# Altium PCB main.PcbDoc (part 1 of 3)
Units mm, origin at the board's own origin, x right, y up, seen from the top; angles counter-clockwise.
Board outline 200 x 85 mm, 2 copper layers (Top Layer, Bottom Layer); 362 components, 202 nets, 1059 pads, 878 vias.
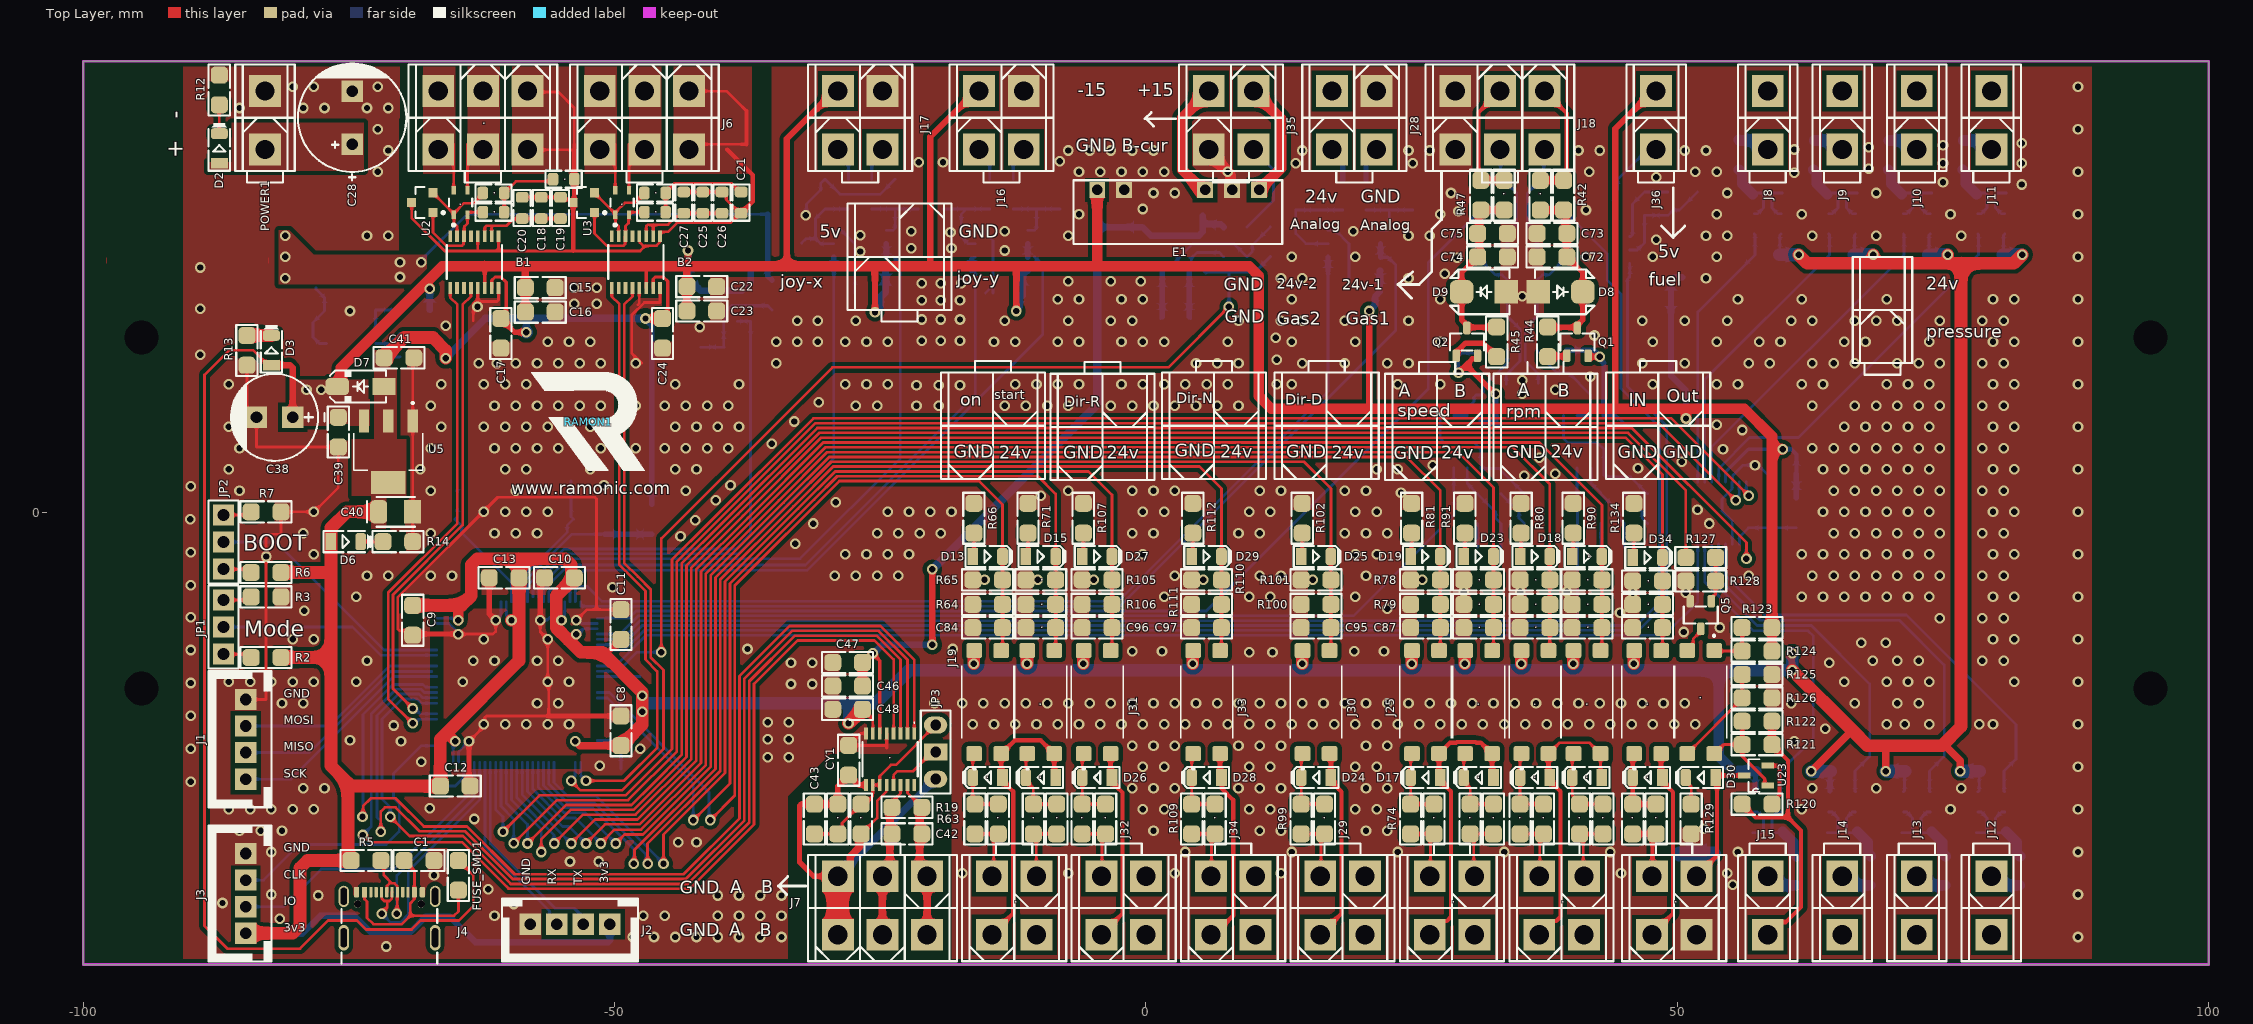
[diagram p0: Top Layer view]
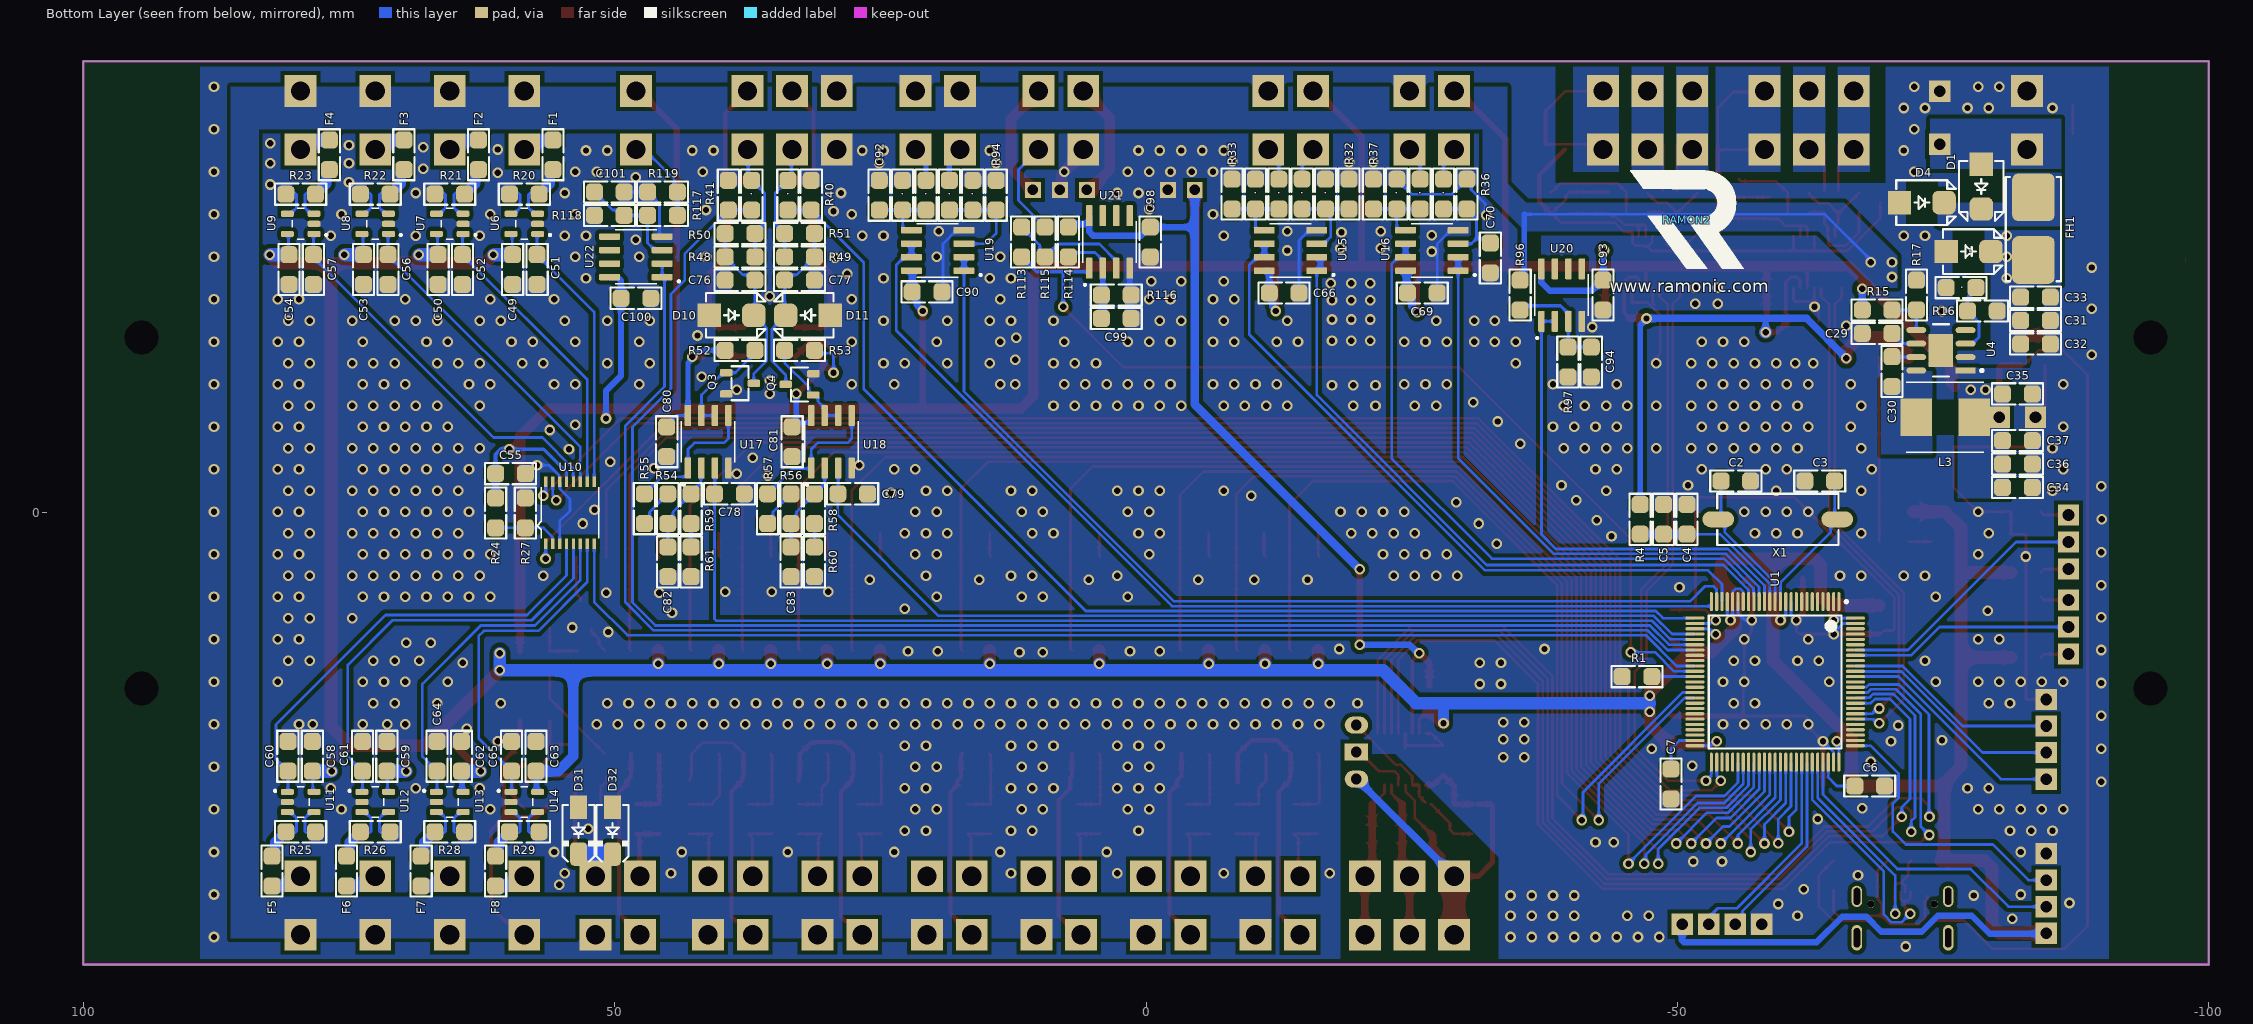
[diagram p1: Bottom Layer view, seen from below]
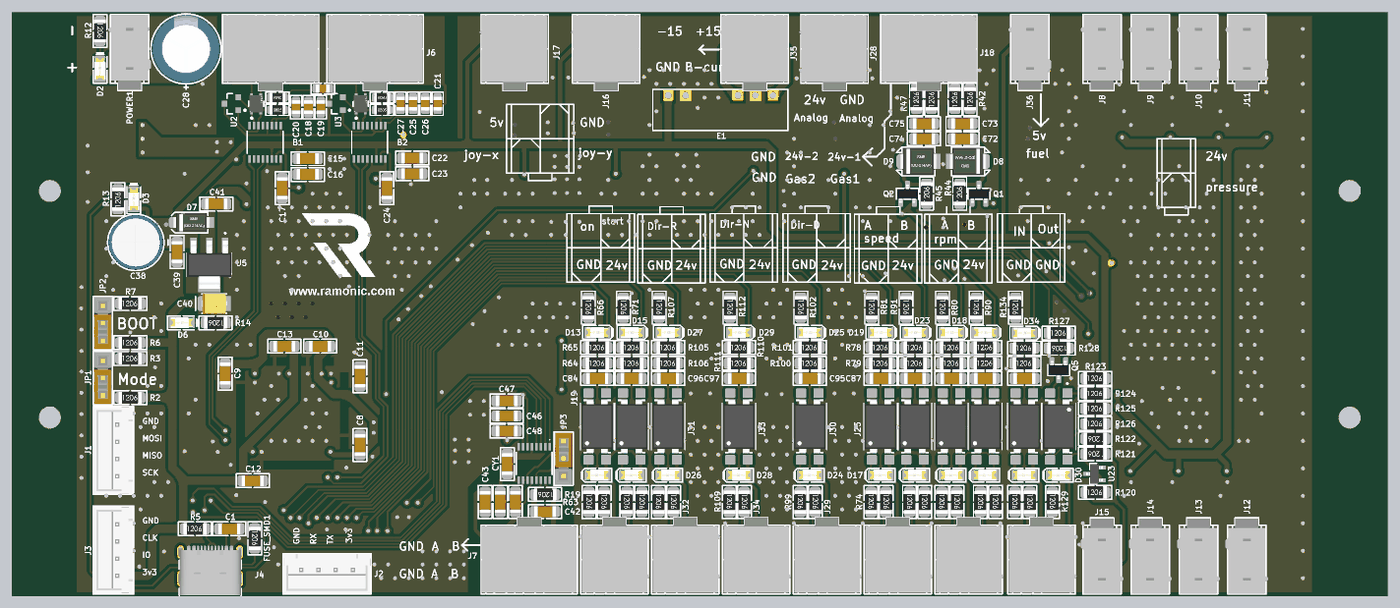
[diagram p4: 3D render of the assembled board from above, using the file's embedded part models]
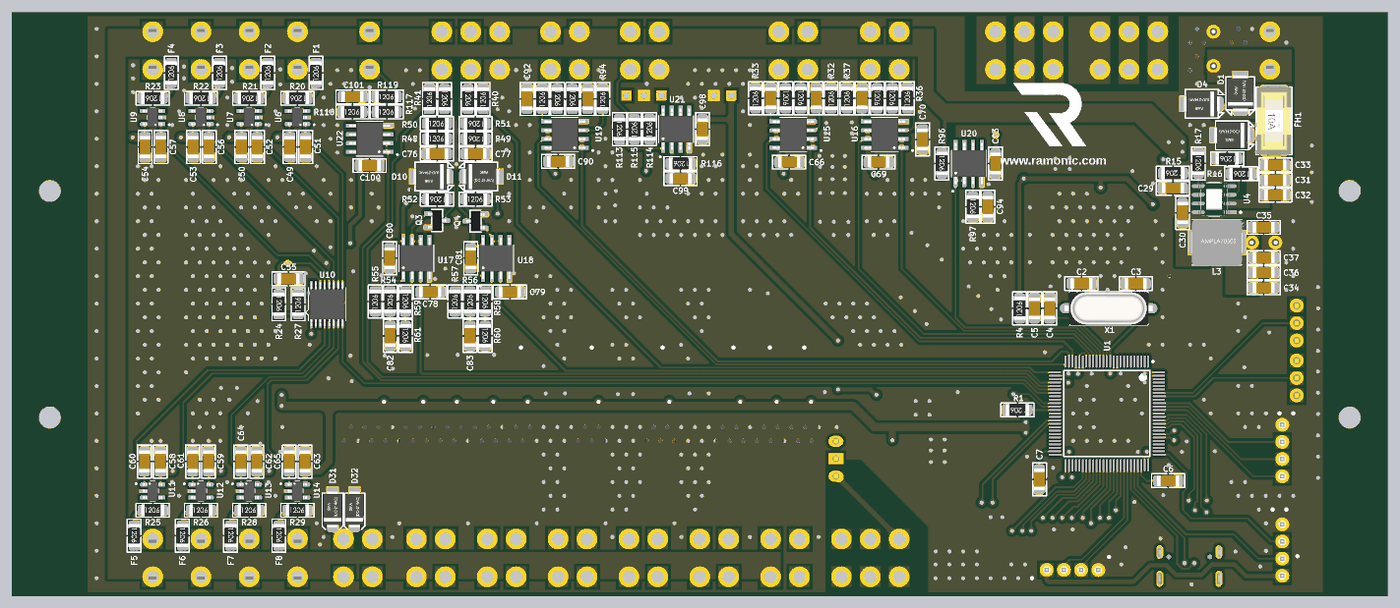
[diagram p5: 3D render of the assembled board from below, using the file's embedded part models]

## Layer stack, top to bottom
Top Solder: solder mask 0.0102, Solder Resist, Dk 3.5
Top Layer: signal copper 0.0356
Dielectric 1: dielectric 0.32, FR-4, Dk 4.8
Bottom Layer: signal copper 0.0356
Bottom Solder: solder mask 0.0102, Solder Resist, Dk 3.5

## Board outline
-100,-42.5 100,-42.5 100,42.5 -100,42.5

## Design rules (kind name [scope] priority, off if disabled: settings)
AcuteAngle [All] p1: minimum=7.50000000000000E+0001 checktracksonly=FALSE
BoardOutlineClearance [All] p1: gap=0.4 ignorepadtopadclearanceinfootprint=FALSE
Clearance [All] p1: gap=0.2 ignorepadtopadclearanceinfootprint=FALSE except(0.3: Arc-THPad Arc-Hole Track-THPad Track-Hole SMDPad-THPad SMDPad-Hole THPad-THPad THPad-Via THPad-Fill THPad-Region THPad-Hole Via-Via Via-Fill Via-Region Via-Hole Fill-Hole Region-Hole; 0.4: Arc-Poly Track-Poly SMDPad-Poly THPad-Poly Via-Poly Fill-Poly Poly-Poly Poly-Region Poly-Text Poly-Hole)
FanoutControl Fanout_Default [All] p1: bgadir=Out bgaviamode=Centered fanoutstyle=Auto fanoutdirection=Alternating viagrid=0.025 // Fanout_Default (Default Rule)
FanoutControl Fanout_Small [(CompPinCount < 5)] p2: bgadir=Out bgaviamode=Centered fanoutstyle=Auto fanoutdirection=OutThenIn viagrid=0.025 // Fanout_Small (Default Rule)
FanoutControl Fanout_LCC [IsLCC] p4: bgadir=Out bgaviamode=Centered fanoutstyle=Auto fanoutdirection=Alternating viagrid=0.025 // Fanout_LCC (Default Rule)
FanoutControl Fanout_BGA [IsBGA] p5: bgadir=Out bgaviamode=Centered fanoutstyle=Auto fanoutdirection=Alternating viagrid=0.025 // Fanout_BGA (Default Rule)
HoleSize [All] p1: absolutevalues=TRUE maxlimit=50 minlimit=0.4 maxpercent=80.000 minpercent=20.000
HoleToHoleClearance [All] p1: gap=0.3 allowstackedmicrovias=TRUE
MinimumAnnularRing [All] p1: minimumring=0.2
MinimumSolderMaskSliver [All] p1: minsoldermaskwidth=0.2
PlaneConnect [All] p1: planeconnectstyle=Direct reliefexpansion=0.508 reliefentries=4 reliefconductorwidth=0.254 reliefairgap=0.254
PolygonConnect [All] p1: connectstyle=Direct reliefconductorwidth=0.254 reliefentries=4 polygonreliefangle="90 Angle" airgapwidth=0.254
RoutingVias [All] p1: holewidth=0.5 width=0.9 viastyle="Through Hole" minholewidth=0.4 minwidth=0.8 maxholewidth=2 maxwidth=3
SilkToSolderMaskClearance [IsPad] p1: minsilkscreentomaskgap=0.2 clearancetoexposedcopper=TRUE
SolderMaskExpansion [All] p1: expansion=0.102 istentingtop=FALSE
SupplyNets "Schematic Supply Nets_9" [InNet('GND6')] p1: voltage=0.000
SupplyNets "Schematic Supply Nets_8" [InNet('GND2')] p2: voltage=0.000
SupplyNets "Schematic Supply Nets_7" [InNet('GND3')] p3: voltage=0.000
SupplyNets "Schematic Supply Nets_6" [InNet('GND5')] p4: voltage=0.000
SupplyNets "Schematic Supply Nets_5" [InNet('GND4')] p5: voltage=0.000
SupplyNets "Schematic Supply Nets_4" [InNet('GND7')] p6: voltage=0.000
SupplyNets "Schematic Supply Nets_3" [InNet('GND1')] p7: voltage=0.000
SupplyNets "Schematic Supply Nets_2" [InNet('MGND')] p8: voltage=0.000
SupplyNets "Schematic Supply Nets_1" [InNet('MCUGND')] p9: voltage=0.000
SupplyNets "Schematic Supply Nets" [InNet('RGND')] p10: voltage=0.000
Width [All] p1: maxlimit=10 minlimit=0.2 preferedwidth=0.254
21 further rules are at their usual default settings.

## Classes and differential pairs
component class INPUTOUTPUTDIGITAL: . D30 D31 D32 D34 Q5 R120 R121 R122 R123 R124 R125 R126 R127 R128 R129 R134 U23
component class switchStart: . C84 D13 D15 J19 R63 R64 R65 R66 R71
component class speed-and-rpm: . C87 D17 D18 D19 D23 J25 R74 R78 R79 R80 R81 R90 R91
component class speed-and-rpm-analog: . C90 C92 J28 R94 U19
component class RS485: . C42 C43 C46 C47 C48 CY1 J7 JP3 R19
component class pressure-transmitter: C49 C50 C51 C52 C53 C54 C55 C56 C57 C58 C59 C60 C61 C62 C63 C64 C65 F1 F2 F3 F4 F5 F6 F7 F8 J8 J9 J10 J11 J12 J13 J14 J15 R20 R21 R22 R23 R24 R25 R26 R27 R28 R29 U6 U7 U8 U9 U10 U11 U12 U13 U14
component class power: . C28 C29 C30 C31 C32 C33 C34 C35 C36 C37 C38 C39 C40 C41 D1 D2 D3 D4 D6 D7 FH1 L3 POWER1 R12 R13 R14 R15 R16 R17 U4 U5
component class Micro-Switch: . C95 C96 C97 D24 D25 D26 D27 D28 D29 J29 J30 J31 J32 J33 J34 R99 R100 R101 R102 R105 R106 R107 R109 R110 R111 R112
component class MainCurrent: C98 C99 E1 J35 R113 R114 R115 R116 U21
component class gas: . C72 C73 C74 C75 C76 C77 C78 C79 C80 C81 C82 C83 D8 D9 D10 D11 J18 Q1 Q2 Q3 Q4 R40 R41 R42 R44 R45 R47 R48 R49 R50 R51 R52 R53 R54 R55 R56 R57 R58 R59 R60 R61 U17 U18
component class fuelGauge: C100 C101 J36 R117 R118 R119 U22
component class CAN: . B1 B2 C15 C16 C17 C18 C19 C20 C21 C22 C23 C24 C25 C26 C27 J6 U2 U3
component class battery-voltage: C93 C94 R96 R97 U20
component class analog-joystick: . C66 C69 C70 J16 J17 R32 R33 R36 R37 U15 U16
component class MCU: C1 C2 C3 C4 C5 C6 C7 C8 C9 C10 C11 C12 C13 FUSE_SMD1 J1 J2 J3 J4 JP1 JP2 R1 R2 R3 R4 R5 R6 R7 RAMON1 RAMON2 U1 X1

## Components (designator, comment, footprint, x,y, rotation, side; value= is the part's Value field where it differs from the comment)
. "LED1206RED" LED1206RED 47.2,-24.9 r180 top (schematic designator D33)
. "LED1206GRN" LED1206GRN 41.5,-4.1 r0 top (schematic designator D22)
. "LED1206RED" LED1206RED 31.3,-24.9 r180 top locked (schematic designator D21)
. "LED1206RED" LED1206RED 41.5,-24.9 r180 top locked (schematic designator D20)
. "LED1206RED" LED1206RED 36.6,-24.9 r180 top locked (schematic designator D16)
. "LED1206RED" LED1206RED -9.9,-24.9 r180 top locked (schematic designator D14)
. "LED1206RED" LED1206RED -14.9,-24.9 r180 top locked (schematic designator D12)
. "RES1206 4.7K 1%" R1206#1 47.2,-6.4 r0 top (schematic designator R133)
. "RES1206 4.7K 1%" R1206#1 47.2,-8.6 r0 top (schematic designator R132)
. "RES1206 4.7K 1%" R1206#1 48,-28.8 r270 top (schematic designator R131)
. "RES1206 4.7K 1%" R1206#1 45.8,-28.8 r270 top (schematic designator R130)
. "EL817S" SOIC254P1030X460-4N 47.2,-17.8 r90 top (schematic designator J39)
. "CONN_ATXPWR_4" ATXPWR_4 49.7,-37.191 r180 top locked (schematic designator J38)
. "EL817S" SOIC254P1030X460-4N 52.2,-17.8 r270 top (schematic designator J37)
. "CAP1206 100nf 50V" C1206#1 47.2,-10.8 r180 top locked (schematic designator C102)
. "CAP0805 4.7nf 50V" C0805 -54.8,31.4 r0 top (schematic designator C14)
. "CAP1206 10uf 50V" C1206#1 -29,-28.8 r90 top (schematic designator C44)
. "CAP1206 1uf 50V" C1206#1 -26.8,-28.8 r270 top (schematic designator C45)
. "CAP1206 100nf 50V" C1206#2 -16.9,30 r90 bottom locked (schematic designator C67)
. "CAP1206 100nf 50V" C1206#2 -10.3,30 r90 bottom locked (schematic designator C68)
. "CAP1206 100nf 50V" C1206#2 -23.6,30 r90 bottom locked (schematic designator C71)
. "CAP1206 1nf 50V" C1206#1 -9.9,-10.8 r180 top locked (schematic designator C85)
. "CAP1206 1nf 50V" C1206#1 36.6,-10.8 r180 top locked (schematic designator C86)
. "CAP1206 1nf 50V" C1206#1 41.5,-10.8 r180 top locked (schematic designator C88)
. "CAP1206 1nf 50V" C1206#1 31.3,-10.8 r180 top locked (schematic designator C89)
. "CAP1206 1nf 50V" C1206#2 16.3,29.9 r90 bottom (schematic designator C91)
. "CONN_ATXPWR_4" ATXPWR_4 -12.4,-37.191 r180 top locked (schematic designator J20)
. "EL817S" SOIC254P1030X460-4N -9.9,-17.8 r90 top locked (schematic designator J21)
. "CONN_ATXPWR_4" ATXPWR_4 39.1,-37.191 r180 top locked (schematic designator J22)
. "CONN_ATXPWR_4" ATXPWR_4 28.8,-37.191 r180 top locked (schematic designator J23)
. "EL817S" SOIC254P1030X460-4N 36.6,-17.8 r90 top locked (schematic designator J24)
. "EL817S" SOIC254P1030X460-4N 41.5,-17.8 r90 top locked (schematic designator J26)
. "EL817S" SOIC254P1030X460-4N 31.3,-17.8 r90 top locked (schematic designator J27)
. "ACM2520-102-2P-T002" FP-ACM2520-2P-MFG -64.5,29.2 r90 top (schematic designator L1)
. "ACM2520-102-2P-T002" FP-ACM2520-2P-MFG -49.3,29.2 r90 top (schematic designator L2)
. "RES1206 60 1%" R0805 -46.2,28.3 r0 top (schematic designator R11)
. "RES1206 10K 1%" R1206#2 -76.7,21.2 r0 bottom (schematic designator R18)
. "RES1206 1k 1%" R1206#2 -14.7,30 r270 bottom locked (schematic designator R30)
. "RES1206 1k 1%" R1206#2 -12.5,30 r270 bottom locked (schematic designator R31)
. "RES1206 1k 1%" R1206#2 -28,30 r270 bottom locked (schematic designator R34)
. "RES1206 1k 1%" R1206#2 -25.8,30 r270 bottom locked (schematic designator R35)
. "RES1206 100k 1%" R1206#2 33.7,29.9 r270 bottom (schematic designator R38)
. "RES1206 100k 1%" R1206#2 37.1,29.9 r270 bottom (schematic designator R39)
. "RES1206 1.6k 1%" R1206#1 33.7,29.9 r90 top (schematic designator R43)
. "RES1206 1.6k 1%" R1206#1 37.1,29.9 r90 top (schematic designator R46)
. "RES1206 4.7K 1%" R1206#1 -13.9,-28.8 r270 top (schematic designator R62)
. "RES1206 4.7K 1%" R1206#1 -10.6,-28.8 r270 top (schematic designator R67)
. "RES1206 4.7K 1%" R1206#1 -8.4,-28.8 r270 top (schematic designator R68)
. "RES1206 4.7K 1%" R1206#1 -9.9,-6.3 r0 top locked (schematic designator R69)
. "RES1206 4.7K 1%" R1206#1 -9.9,-8.6 r0 top locked (schematic designator R70)
. "RES1206 4.7K 1%" R1206#1 37.4,-28.8 r270 top locked (schematic designator R72)
. "RES1206 4.7K 1%" R1206#1 35.2,-28.8 r270 top locked (schematic designator R73)
. "RES1206 4.7K 1%" R1206#1 27.1,-28.8 r270 top locked (schematic designator R75)
. "RES1206 4.7K 1%" R1206#1 36.6,-8.6 r0 top locked (schematic designator R76)
. "RES1206 4.7K 1%" R1206#1 36.6,-6.3 r0 top locked (schematic designator R77)
. "RES1206 4.7K 1%" R1206#1 40.8,-28.8 r270 top locked (schematic designator R82)
. "RES1206 4.7K 1%" R1206#1 43,-28.8 r270 top locked (schematic designator R83)
. "RES1206 4.7K 1%" R1206#1 30.5,-28.8 r270 top locked (schematic designator R84)
. "RES1206 4.7K 1%" R1206#1 32.7,-28.8 r270 top locked (schematic designator R85)
. "RES1206 4.7K 1%" R1206#1 41.5,-8.6 r0 top locked (schematic designator R86)
. "RES1206 4.7K 1%" R1206#1 41.5,-6.3 r0 top locked (schematic designator R87)
. "RES1206 4.7K 1%" R1206#1 31.3,-8.6 r0 top locked (schematic designator R88)
. "RES1206 4.7K 1%" R1206#1 31.3,-6.3 r0 top locked (schematic designator R89)
. "RES1206 10k 1%" R1206#2 18.5,29.9 r270 bottom (schematic designator R92)
. "RES1206 10k 1%" R1206#2 20.7,29.9 r270 bottom (schematic designator R93)
. "RES1206 1k 1%" R1206#2 22.9,29.9 r90 bottom (schematic designator R95)
. "RES1206 4.7K 1%" R1206#1 16.8,-28.8 r270 top locked (schematic designator R98)
. "RES1206 4.7K 1%" R1206#1 -3.8,-28.8 r270 top locked (schematic designator R103)
. "RES1206 4.7K 1%" R1206#1 -6,-28.8 r270 top locked (schematic designator R104)
. "RES1206 4.7K 1%" R1206#1 6.5,-28.8 r270 top locked (schematic designator R108)
. "CA-IS2092A" CAIS2062A -24.075,-23.175 r270 top (schematic designator RS1)
. "CONN_ATXPWR_6" ATXPWR_6 -62.4,37.191 r0 top (schematic designator J5)
. "RES1206 60 1%" R0805 -46.2,30.1 r180 top (schematic designator R10)
. "SMBJ24CA" D_SMB#1 -77.4,24.6 r180 bottom (schematic designator D5)
. "RES1206 60 1%" R0805 -61.4,28.3 r0 top (schematic designator R9)
. "RES1206 60 1%" R0805 -61.4,30.1 r180 top (schematic designator R8)
B1 "CA-IS2062A" CAIS2062A -63.2,23.6 r90 top locked
B2 "CA-IS2062A" CAIS2062A -48,23.6 r90 top locked
C1 "CAP1206 100nf 50V" C1206#1 -68.4,-32.7 r180 top
C2 "CAP1206 22pf 50V" C1206#2 -55.5,3 r0 bottom locked
C3 "CAP1206 22pf 50V" C1206#2 -63.4,3 r180 bottom locked
C4 "CAP1206 1uf 50V" C1206#2 -50.9,-0.6 r270 bottom locked
C5 "CAP1206 100nf 50V" C1206#2 -48.7,-0.6 r270 bottom locked
C6 "CAP1206 2.2uf 50V" C1206#2 -68.1,-25.7 r0 bottom
C7 "CAP1206 2.2uf 50V" C1206#2 -49.4,-25.5 r90 bottom
C8 "CAP1206 100nf 50V" C1206#1 -49.4,-20.5 r270 top locked
C9 "CAP1206 100nf 50V" C1206#1 -69,-10.1 r90 top locked
C10 "CAP1206 100nf 50V" C1206#1 -55.2,-6.1 r0 top locked
C11 "CAP1206 100nf 50V" C1206#1 -49.4,-10.5 r270 top locked
C12 "CAP1206 100nf 50V" C1206#1 -65,-25.7 r180 top locked
C13 "CAP1206 100nf 50V" C1206#1 -60.4,-6.1 r0 top locked
C15 "CAP1206 10uf 50V" C1206#1 -57,21.2 r180 top
C16 "CAP1206 100nf 50V" C1206#1 -57,18.9 r180 top
C17 "CAP1206 100nf 50V" C1206#1 -60.7,16.9 r270 top
C18 "CAP0805 100nf 50V" C0805 -56.9,28.7 r270 top
C19 "CAP0805 100nf 50V" C0805 -55.1,28.7 r270 top
C20 "CAP0805 100nf 50V" C0805 -58.7,28.7 r270 top
C21 "CAP0805 4.7nf 50V" C0805 -38.1,29.2 r270 top
C22 "CAP1206 10uf 50V" C1206#1 -41.8,21.3 r180 top
C23 "CAP1206 100nf 50V" C1206#1 -41.8,19 r180 top
C24 "CAP1206 100nf 50V" C1206#1 -45.5,16.9 r270 top
C25 "CAP0805 100nf 50V" C0805 -41.7,29.2 r270 top
C26 "CAP0805 100nf 50V" C0805 -39.9,29.2 r270 top
C27 "CAP0805 100nf 50V" C0805 -43.5,29.2 r270 top
C28 "HT1V477M1012PC" C_EL_10X16 -74.7,37.191 r90 top locked value=470uF
C29 "CAP1206 1uf 50V" C1206#2 -68.8,16.9 r0 bottom
C30 "CAP1206 100nf 50V" C1206#2 -70.2,13.3 r270 bottom
C31 "CAP1206 10uf 50V" C1206#2 -83.7,18.1 r180 bottom
C32 "CAP1206 10uf 50V" C1206#2 -83.7,15.9 r180 bottom
C33 "CAP1206 220nf 50V" C1206#2 -83.7,20.3 r180 bottom
C34 "CAP1206 10uf 50V" C1206#2 -82,2.4 r180 bottom
C35 "CAP1206 10uf 50V" C1206#2 -82,11.2 r180 bottom
C36 "CAP1206 10uf 50V" C1206#2 -82,4.6 r180 bottom
C37 "CAP1206 10uf 50V" C1206#2 -82,6.8 r180 bottom
C38 "100uF" C_EL_8X12 -82,9 r180 top
C39 "CAP1206 1uf 50V" C1206#1 -76,7.6 r270 top
C40 "47uF" C_TN_3528 -70.6,0.1 r0 top
C41 "CAP1206 2.2uf 50V" C1206#1 -70.3,14.6 r0 top
C42 "CAP1206 100nf 50V" C1206#1 -22.5,-30.2 r180 top
C43 "CAP1206 10nf 50V" C1206#1 -31.2,-28.8 r90 top
C46 "CAP1206 10uf 50V" C1206#1 -28.075,-16.275 r180 top
C47 "CAP1206 10nf 50V" C1206#1 -28.075,-14.075 r180 top
C48 "CAP1206 1uf 50V" C1206#1 -28.075,-18.475 r180 top
C49 "CAP1206 100nf 50V" C1206#2 59.6,22.9 r90 bottom locked
C50 "CAP1206 100nf 50V" C1206#2 66.614,22.9 r90 bottom locked
C51 "CAP1206 100nf 50V" C1206#2 57.3,22.9 r270 bottom locked
C52 "CAP1206 100nf 50V" C1206#2 64.314,22.9 r270 bottom locked
C53 "CAP1206 100nf 50V" C1206#2 73.629,22.9 r90 bottom locked
C54 "CAP1206 100nf 50V" C1206#2 80.643,22.9 r90 bottom locked
C55 "CAP1206 100nf 50V" C1206#2 59.8,3.7 r0 bottom
C56 "CAP1206 100nf 50V" C1206#2 71.329,22.9 r270 bottom locked
C57 "CAP1206 100nf 50V" C1206#2 78.343,22.9 r270 bottom locked
C58 "CAP1206 100nf 50V" C1206#2 78.443,-22.9 r270 bottom locked
C59 "CAP1206 100nf 50V" C1206#2 71.429,-22.9 r270 bottom locked
C60 "CAP1206 100nf 50V" C1206#2 80.743,-22.9 r90 bottom locked
C61 "CAP1206 100nf 50V" C1206#2 73.729,-22.9 r90 bottom locked
C62 "CAP1206 100nf 50V" C1206#2 64.414,-22.9 r270 bottom locked
C63 "CAP1206 100nf 50V" C1206#2 57.4,-22.9 r270 bottom locked
C64 "CAP1206 100nf 50V" C1206#2 66.714,-22.9 r90 bottom locked
C65 "CAP1206 100nf 50V" C1206#2 59.7,-22.9 r90 bottom locked
C66 "CAP1206 100nf 50V" C1206#2 -13,20.7 r0 bottom
C69 "CAP1206 100nf 50V" C1206#2 -26,20.7 r0 bottom
C70 "CAP1206 100nf 50V" C1206#2 -32.4,24 r270 bottom
C72 "CAP1206 100nf 50V" C1206#1 38.2,24.1 r180 top
C73 "CAP1206 1uf 50V" C1206#1 38.2,26.3 r180 top
C74 "CAP1206 100nf 50V" C1206#1 32.6,24.1 r0 top
C75 "CAP1206 1uf 50V" C1206#1 32.6,26.3 r0 top
C76 "CAP1206 330pf 50V" C1206#2 38.2,21.9 r0 bottom
C77 "CAP1206 330pf 50V" C1206#2 32.6,21.9 r180 bottom
C78 "CAP1206 330pf 50V" C1206#2 39.2,1.8 r180 bottom
C79 "CAP1206 330pf 50V" C1206#2 27.6,1.8 r180 bottom
C80 "CAP1206 100nf 50V" C1206#2 45.1,6.7 r270 bottom
C81 "CAP1206 100nf 50V" C1206#2 33.3,6.7 r270 bottom
C82 "CAP1206 100pf 50V" C1206#2 45,-4.6 r270 bottom
C83 "CAP1206 100pf 50V" C1206#2 33.4,-4.6 r270 bottom
C84 "CAP1206 1nf 50V" C1206#1 -14.9,-10.8 r180 top locked
C87 "CAP1206 1nf 50V" C1206#1 26.3,-10.8 r180 top locked
C90 "CAP1206 100nf 50V" C1206#2 20.6,20.8 r0 bottom
C92 "CAP1206 1nf 50V" C1206#2 25.1,29.9 r90 bottom
C93 "CAP1206 100nf 50V" C1206#2 -43,20.5 r90 bottom
C94 "CAP1206 1nf 50V" C1206#2 -41.9,14.2 r270 bottom
C95 "CAP1206 1nf 50V" C1206#1 16,-10.8 r180 top locked
C96 "CAP1206 1nf 50V" C1206#1 -4.6,-10.8 r180 top locked
C97 "CAP1206 1nf 50V" C1206#1 5.7,-10.8 r180 top locked
C98 "CAP1206 100nf 50V" C1206#2 -0.4,25.5 r90 bottom
C99 "CAP1206 100nf 50V" C1206#2 2.8,18.3 r0 bottom
C100 "CAP1206 100nf 50V" C1206#2 48,20.2 r0 bottom
C101 "CAP1206 100nf 50V" C1206#2 50.5,30.2 r180 bottom
CY1 "CAP1206 39pf 50V" C1206#1 -27.975,-23.275 r90 top
D1 "SS34" D_SMB#1 -78.6,30.7 r270 bottom locked
D2 "LED1206GRN" LED1206GRN -87.2,34.3 r90 top locked
D3 "LED1206GRN" LED1206GRN -82.3,15.3 r90 top
D4 "SS34" D_SMB#1 -73,29.2 r180 bottom
D6 "LED1206GRN" LED1206GRN -75.3,-2.7 r0 top
D7 "ss14" D_SMA#1 -73.9,11.9 r180 top
D8 "SS34" D_SMB#2 39,20.8 r0 top
D9 "SS34" D_SMB#2 31.8,20.8 r180 top
D10 "SS34" D_SMB#1 39,18.6 r180 bottom
D11 "SS34" D_SMB#1 31.8,18.6 r0 bottom
D13 "LED1206GRN" LED1206GRN -14.9,-4.1 r0 top
D15 "LED1206GRN" LED1206GRN -9.9,-4.1 r0 top
D17 "LED1206RED" LED1206RED 26.3,-24.9 r180 top locked
D18 "LED1206GRN" LED1206GRN 36.6,-4.1 r0 top
D19 "LED1206GRN" LED1206GRN 26.3,-4.1 r0 top
D23 "LED1206GRN" LED1206GRN 31.3,-4.1 r0 top
D24 "LED1206RED" LED1206RED 16,-24.9 r180 top locked
D25 "LED1206GRN" LED1206GRN 16,-4.1 r0 top
D26 "LED1206RED" LED1206RED -4.6,-24.9 r180 top locked
D27 "LED1206GRN" LED1206GRN -4.6,-4.1 r0 top
D28 "LED1206RED" LED1206RED 5.7,-24.9 r180 top locked
D29 "LED1206GRN" LED1206GRN 5.7,-4.1 r0 top
D30 "LED1206GRN" LED1206GRN 52.2,-24.9 r180 top
D31 "SS16" D_SMA#2 53.4,-29.9 r270 bottom
D32 "SS16" D_SMA#2 50.2,-29.9 r270 bottom
D34 "LED1206GRN" LED1206GRN 47.2,-4.2 r0 top
E1 "E0515S-1WR3" PCBComponent_1#1 3,28.3 r270 top
F1 "FUSE 1206" R1206#2 55.8,33.7 r90 bottom locked
F2 "FUSE 1206" R1206#2 62.814,33.7 r90 bottom locked
F3 "FUSE 1206" R1206#2 69.829,33.7 r90 bottom locked
F4 "FUSE 1206" R1206#2 76.843,33.7 r90 bottom locked
F5 "FUSE 1206" R1206#2 82.243,-33.7 r270 bottom locked
F6 "FUSE 1206" R1206#2 75.229,-33.7 r270 bottom locked
F7 "FUSE 1206" R1206#2 68.214,-33.7 r270 bottom locked
F8 "FUSE 1206" R1206#2 61.2,-33.7 r270 bottom locked
FH1 "xf-155" FH_24101812 -83.5,26.7 r270 bottom value="Fuse Holder"
FUSE_SMD1 "FUSE1206" R1206#1 -64.7,-34.1 r270 top
J1 "XH_4" XH_4 -84.7,-21.3 r90 top locked
J2 "XH_4" XH_4 -54.2,-38.7 r180 top
J3 "XH_4" XH_4 -84.7,-35.8 r90 top locked
J4 "DX07S016JA1" USBC_SMD_16_DX07S016JA1 -71.19,-35.68 r180 top
J6 "CONN_ATXPWR_6" ATXPWR_6 -47.2,37.191 r0 top locked
J7 "CONN_ATXPWR_6" ATXPWR_6 -24.8,-37.191 r180 top locked
J8 "CONN_ATXPWR_2" ATXPWR_2 58.5,37.191 r0 top locked
J9 "CONN_ATXPWR_2" ATXPWR_2 65.514,37.191 r0 top locked
J10 "CONN_ATXPWR_2" ATXPWR_2 72.529,37.191 r0 top locked
J11 "CONN_ATXPWR_2" ATXPWR_2 79.543,37.191 r0 top locked
J12 "CONN_ATXPWR_2" ATXPWR_2 79.543,-37.191 r180 top locked
J13 "CONN_ATXPWR_2" ATXPWR_2 72.529,-37.191 r180 top locked
J14 "CONN_ATXPWR_2" ATXPWR_2 65.514,-37.191 r180 top locked
J15 "CONN_ATXPWR_2" ATXPWR_2 58.5,-37.191 r180 top locked
J16 "CONN_ATXPWR_4" ATXPWR_4 -13.6,37.191 r0 top locked
J17 "CONN_ATXPWR_4" ATXPWR_4 -26.9,37.191 r0 top locked
J18 "CONN_ATXPWR_6" ATXPWR_6 33.3,37.191 r0 top locked
J19 "EL817S" SOIC254P1030X460-4N -14.9,-17.8 r90 top locked
J25 "EL817S" SOIC254P1030X460-4N 26.3,-17.8 r90 top locked
J28 "CONN_ATXPWR_4" ATXPWR_4 19.6,37.191 r0 top locked
J29 "CONN_ATXPWR_4" ATXPWR_4 18.5,-37.191 r180 top locked
J30 "EL817S" SOIC254P1030X460-4N 16,-17.8 r90 top locked
J31 "EL817S" SOIC254P1030X460-4N -4.6,-17.8 r90 top locked
J32 "CONN_ATXPWR_4" ATXPWR_4 -2.1,-37.191 r180 top locked
J33 "EL817S" SOIC254P1030X460-4N 5.7,-17.8 r90 top locked
J34 "CONN_ATXPWR_4" ATXPWR_4 8.2,-37.191 r180 top locked
J35 "CONN_ATXPWR_4" ATXPWR_4 8,37.191 r0 top locked
J36 "CONN_ATXPWR_2" ATXPWR_2 48,37.191 r0 top locked
JP1 "JMPHDR3PIN" JPH_3#1 -86.8,-10.74 r90 top locked
JP2 "JMPHDR3PIN" JPH_3#1 -86.8,-2.74 r90 top locked
JP3 "JMPHDR3PIN" JPH_3#2 -19.8,-22.5 r270 top
L3 "8uH-7.3mmx6.6mm" IND_AMPLA7050S-100MT -75.2,9 r180 bottom
POWER1 "CONN_ATXPWR_2" ATXPWR_2 -82.9,37.191 r0 top locked
Q1 "SS8050" SOT23_3#1 40.6,16.1 r90 top
Q2 "SS8050" SOT23_3#1 30.2,16.1 r90 top
Q3 "SS8050" SOT23_3#2 38.2,12.2 r180 bottom
Q4 "SS8050" SOT23_3#2 32.6,12.1 r0 bottom
Q5 "2N7002" SOT23_3#1 52.2,-9.6 r270 top locked
R1 "RES1206 4.7K 1%" R1206#2 -46.2,-15.4 r0 bottom
R2 "RES1206 4.7K 1%" R1206#1 -82.8,-13.6 r0 top locked
R3 "RES1206 4.7K 1%" R1206#1 -82.8,-7.9 r0 top locked
R4 "RES1206 4.7K 1%" R1206#2 -46.5,-0.6 r90 bottom locked
R5 "RES1206 4.7K 1%" R1206#1 -73.4,-32.7 r0 top
R6 "RES1206 4.7K 1%" R1206#1 -82.8,-5.6 r0 top locked
R7 "RES1206 4.7K 1%" R1206#1 -82.8,0.1 r0 top locked
R12 "RES1206 2.2K 1%" R1206#1 -87.2,39.8 r270 top locked
R13 "RES1206 560R 1%" R1206#1 -84.6,15.3 r90 top
R14 "RES1206 180R 1%" R1206#1 -70.4,-2.7 r180 top
R15 "RES1206 100k 1%" R1206#2 -68.8,19.1 r0 bottom
R16 "RES1206 100K 1%" R1206#2 -78.7,19 r0 bottom
R17 "RES1206 24.9k 1%" R1206#2 -72.5,20.5 r270 bottom
R19 "RES1206 120R 1%" R1206#1 -22.5,-27.7 r180 top
R20 "RES1206 1R 1%" R1206#2 58.5,30 r0 bottom
R21 "RES1206 1R 1%" R1206#2 65.514,30 r0 bottom
R22 "RES1206 1R 1%" R1206#2 72.529,30 r0 bottom
R23 "RES1206 1R 1%" R1206#2 79.543,30 r0 bottom
R24 "RES1206 10K 1%" R1206#2 61.2,0 r270 bottom
R25 "RES1206 1R 1%" R1206#2 79.543,-30 r180 bottom
R26 "RES1206 1R 1%" R1206#2 72.529,-30 r180 bottom
R27 "RES1206 10K 1%" R1206#2 58.4,0 r90 bottom
R28 "RES1206 1R 1%" R1206#2 65.514,-30 r180 bottom
R29 "RES1206 1R 1%" R1206#2 58.5,-30 r180 bottom
R32 "RES1206 2k 1%" R1206#2 -19.1,30 r90 bottom locked
R33 "RES1206 2k 1%" R1206#2 -8.1,30 r90 bottom locked
R36 "RES1206 2k 1%" R1206#2 -30.2,30 r90 bottom locked
R37 "RES1206 2k 1%" R1206#2 -21.4,30 r90 bottom locked
R40 "RES1206 10k 1%" R1206#2 31.5,29.9 r90 bottom
R41 "RES1206 10k 1%" R1206#2 39.3,29.9 r90 bottom
R42 "RES1206 1.6k 1%" R1206#1 39.3,29.9 r90 top
R44 "RES1206 2.7k 1%" R1206#1 37.8,16.1 r90 top
R45 "RES1206 2.7k 1%" R1206#1 33,16.1 r90 top
R47 "RES1206 1.6k 1%" R1206#1 31.5,29.9 r90 top
R48 "RES1206 4.3k 1%" R1206#2 38.2,24.1 r180 bottom
R49 "RES1206 4.3k 1%" R1206#2 32.6,24.1 r0 bottom
R50 "RES1206 4.3k 1%" R1206#2 38.2,26.3 r180 bottom
R51 "RES1206 4.3k 1%" R1206#2 32.6,26.3 r0 bottom
R52 "RES1206 22k 1%" R1206#2 38.2,15.3 r0 bottom
R53 "RES1206 22k 1%" R1206#2 32.6,15.3 r180 bottom
R54 "RES1206 2k 1%" R1206#2 45,0.4 r90 bottom
R55 "RES1206 2k 1%" R1206#2 47.2,0.4 r90 bottom
R56 "RES1206 2k 1%" R1206#2 33.4,0.4 r90 bottom
R57 "RES1206 2k 1%" R1206#2 35.6,0.4 r90 bottom
R58 "RES1206 2k 1%" R1206#2 31.2,0.4 r270 bottom
R59 "RES1206 2k 1%" R1206#2 42.8,0.4 r270 bottom
R60 "RES1206 0R 1%" R1206#2 31.2,-4.6 r270 bottom
R61 "RES1206 0R 1%" R1206#2 42.8,-4.6 r270 bottom
R63 "RES1206 4.7K 1%" R1206#1 -16.1,-28.8 r270 top
R64 "RES1206 4.7K 1%" R1206#1 -14.9,-8.6 r0 top locked
R65 "RES1206 4.7K 1%" R1206#1 -14.9,-6.3 r0 top locked
R66 "RES1206 1k 1%" R1206#1 -16.2,-0.5 r270 top
R71 "RES1206 1k 1%" R1206#1 -11.1,-0.5 r270 top
R74 "RES1206 4.7K 1%" R1206#1 24.9,-28.8 r270 top locked
R78 "RES1206 4.7K 1%" R1206#1 26.3,-6.3 r0 top locked
R79 "RES1206 4.7K 1%" R1206#1 26.3,-8.6 r0 top locked
R80 "RES1206 1k 1%" R1206#1 35.3,-0.5 r270 top
R81 "RES1206 1k 1%" R1206#1 25,-0.5 r270 top
R90 "RES1206 1k 1%" R1206#1 40.2,-0.5 r270 top
R91 "RES1206 1k 1%" R1206#1 30,-0.5 r270 top
R94 "RES1206 1k 1%" R1206#2 14.1,29.9 r90 bottom
R96 "RES1206 10k 1%" R1206#2 -35.2,20.5 r270 bottom
R97 "RES1206 1k 1%" R1206#2 -39.7,14.2 r270 bottom
R99 "RES1206 4.7K 1%" R1206#1 14.6,-28.8 r270 top locked
R100 "RES1206 4.7K 1%" R1206#1 16,-8.6 r0 top locked
R101 "RES1206 4.7K 1%" R1206#1 16,-6.3 r0 top locked
R102 "RES1206 1k 1%" R1206#1 14.7,-0.5 r270 top
R105 "RES1206 4.7K 1%" R1206#1 -4.6,-6.3 r0 top locked
R106 "RES1206 4.7K 1%" R1206#1 -4.6,-8.6 r0 top locked
R107 "RES1206 1k 1%" R1206#1 -5.9,-0.5 r270 top
R109 "RES1206 4.7K 1%" R1206#1 4.3,-28.8 r270 top locked
R110 "RES1206 4.7K 1%" R1206#1 5.7,-6.3 r0 top locked
R111 "RES1206 4.7K 1%" R1206#1 5.7,-8.6 r0 top locked
R112 "RES1206 1k 1%" R1206#1 4.4,-0.5 r270 top
R113 "RES1206 33K 1%" R1206#2 11.7,25.5 r270 bottom
R114 "RES1206 33K 1%" R1206#2 7.3,25.5 r90 bottom
R115 "RES1206 80K 1%" R1206#2 9.5,25.5 r90 bottom
R116 "RES1206 10K 1%" R1206#2 2.8,20.5 r0 bottom
R117 "RES1206 10K 1%" R1206#2 45.5,28 r180 bottom
R118 "RES1206 20K 1%" R1206#2 50.5,28 r180 bottom
R119 "RES1206 180R 1%" R1206#2 45.5,30.2 r180 bottom
R120 "FUSE 1206" R1206#1 57.5,-27.4 r0 top
R121 "RES1206 12K 1%" R1206#1 57.5,-21.8 r180 top
R122 "RES1206 12K 1%" R1206#1 57.5,-19.6 r180 top
R123 "RES1206 1k 1%" R1206#1 57.5,-10.8 r0 top
R124 "RES1206 1k 1%" R1206#1 57.5,-13 r0 top
R125 "RES1206 12K 1%" R1206#1 57.5,-15.2 r0 top
R126 "RES1206 12K 1%" R1206#1 57.5,-17.4 r0 top
R127 "RES1206 100R 1%" R1206#1 52.2,-4.2 r0 top locked
R128 "RES1206 12K 1%" R1206#1 52.2,-6.4 r180 top locked
R129 "RES1206 12K 1%" R1206#1 51.3,-28.8 r270 top
R134 "RES1206 1k 1%" R1206#1 45.9,-0.5 r270 top locked
RAMON1 "WWW.RAMONIC.COM" PCBComponent_1#2 -52.5,8.6 r0 top
RAMON2 "WWW.RAMONIC.COM" PCBComponent_1#2 -50.9,27.6 r180 bottom
U1 "STM32F407VGT6" STM-LQFP100_N -59.2,-15.9 r270 bottom
U2 "NUP2105LT1G" PRKT-SOT23-3_V -68.1,29.2 r180 top locked
U3 "NUP2105LT1G" PRKT-SOT23-3_V -52.9,29.2 r180 top locked
U4 "LMR33630ADDAR" FP-DDA0008J-IPC_C -74.8,15.3 r0 bottom
U5 "TLV76133DCYR" VREG_TLV76133DCYR -71.299,5.749 r270 top
U6 "INA180A1IDBVR" SOT95P280X145-5N 58.5,27.2 r0 bottom
U7 "INA180A1IDBVR" SOT95P280X145-5N 65.514,27.2 r0 bottom
U8 "INA180A1IDBVR" SOT95P280X145-5N 72.529,27.2 r0 bottom
U9 "INA180A1IDBVR" SOT95P280X145-5N 79.543,27.2 r0 bottom
U10 "ADG708BRUZ" TSSOP16 54.2,0 r180 bottom
U11 "INA180A1IDBVR" SOT95P280X145-5N 79.543,-27.2 r180 bottom
U12 "INA180A1IDBVR" SOT95P280X145-5N 72.529,-27.2 r180 bottom
U13 "INA180A1IDBVR" SOT95P280X145-5N 65.514,-27.2 r180 bottom
U14 "INA180A1IDBVR" SOT95P280X145-5N 58.5,-27.2 r180 bottom
U15 "LM358BAIDR" SOIC127P599X175-8N -13.6,24.7 r0 bottom locked
U16 "LM358BAIDR" SOIC127P599X175-8N -26.9,24.7 r0 bottom locked
U17 "LM2903DR" SOIC127P599X175-8N 41.2,6.7 r90 bottom
U18 "LM2903DR" SOIC127P599X175-8N 29.595,6.7 r90 bottom
U19 "LM358BAIDR" SOIC127P599X175-8N 19.6,24.7 r0 bottom locked
U20 "LM358BAIDR" SOIC127P599X175-8N -39.112,20.5 r90 bottom
U21 "LM358BAIDR" SOIC127P599X175-8N 3.435,25.5 r90 bottom
U22 "LM358BAIDR" SOIC127P599X175-8N 48,24.1 r0 bottom
U23 "ZXMP10A13FTA" SOT95P230X110-3N 57.4,-24.7 r180 top
X1 "XTL_8MHz" XTL_2_11X5 -59.45,-0.6 r180 bottom locked

## Footprints (in the part's own frame and the unit in brackets; to place one, negate y for a bottom-side part, rotate by r counter-clockwise, add the part's x,y. Pads: shape width x height; smd on the part's side, far side on the other; paste and mask are expansions set on the pad)
ATXPWR_2 [mm] "Connector; ATX Power; 2 Position, Molex 39281023"
  rect 3x3 hole 1.8 mask-2539.97: 1(0,2.5) 2(0,-3)
  silkscreen extent -2.8,-6.1 2.8,5, body extent -3.1,-6 3.1,5, height 12.8
ATXPWR_4 [mm] "Connector; ATX Power; 4 Position, TE 4-1775099-0"
  rect 3x3 hole 1.8 mask-2539.97: 1(-2.1,2.5) 2(2.1,2.5) 3(-2.1,-3) 4(2.1,-3)
  silkscreen extent -4.9,-6.1 4.9,5, body extent -5.1,-6.1 4.75,4.8, height 13
ATXPWR_6 [mm] "Connector; ATX Power; 6 Position, TE 4-1775099-1"
  rect 3x3 hole 1.8 mask-2539.97: 1(-4.2,2.5) 2(0,2.5) 3(4.2,2.5) 4(-4.2,-3) 5(0,-3) 6(4.2,-3)
  silkscreen extent -7,-6.1 7,5, body extent -6.85,-6.1 6.85,4.8, height 13
C0805 [mm] "CHIP Capacitor, 2.0X1.3mm, 0805"
  rrect50% 1x1.2 smd mask-2539.97: 1(-1,0) 2(1,0)
  Top Layer pour cut-out: -0.5,0.8 0.5,0.8 0.5,-0.8 -0.5,-0.8
  silkscreen extent -1.7,-0.8 1.7,0.8, body extent -1,-0.62 1,0.63, height 1
C1206#1 [mm] "CHIP Capacitor, 3.2X1.6mm, 1206"
  rrect50% 1.6x1.6 smd mask-2539.97: 1(-1.4,0) 2(1.4,0)
  Top Layer pour cut-out: -0.8,1 -0.8,-1 0.8,-1 0.8,1
  silkscreen extent -2.4,-1 2.4,1, body extent -1.6,-0.8 1.6,0.8, height 1
C1206#2 [mm] "CHIP Capacitor, 3.2X1.6mm, 1206"
  rrect50% 1.6x1.6 smd mask+0.075: 1(-1.4,0) 2(1.4,0)
  Top Layer pour cut-out: -0.8,1 -0.8,-1 0.8,-1 0.8,1
  silkscreen extent -2.4,-1 2.4,1, body extent -1.6,-0.8 1.6,0.8, height 1
C_EL_8X12 [mm] "Capacitor Electrolythic, D8.0X12.0H pitch: 3.5mm"
  rect 2x2 hole 1.1 mask-2539.97: 1(-1.7,0) 2(1.7,0)
  silkscreen extent -4.7,-4.1 4.1,4.1, body extent -4.03,-4.03 4.03,4.03, height 2.98
C_EL_10X16 [mm] "Capacitor Electrolythic, D10.0X16.0H pitch: 5.0mm"
  rect 2x2 hole 1.1 mask-2539.97: 1(-2.5,0) 2(2.5,0)
  silkscreen extent -5.9,-5.1 5.1,5.1, body extent -5,-5 5,5, height 16
C_TN_3528 [mm] "CAPACITOR, TAN B, TAN H, TAN T, TAN M, 3528P, 1210P, 3.5X2.8mm"
  rrect50% 1.6x2.2 smd mask-2539.97: 1(-1.6,0)
  rect 1.6x2.2 smd mask-2539.97: 2(1.6,0)
  Top Layer pour cut-out: -0.889,1.4 -0.889,-1.4 0.889,-1.4 0.889,1.4
  silkscreen extent -2.7,-1.4 1.8,1.4, body extent -1.85,-1.47 1.85,1.46, height 2.03
CAIS2062A [mm]
  rect 1.1x0.35 smd mask-2539.97: 1(-2.425,2.275) 2(-2.425,1.625) 3(-2.425,0.975) 4(-2.425,0.325) 5(-2.425,-0.325) 6(-2.425,-0.975) 7(-2.425,-1.625) 8(-2.425,-2.275) 9(2.425,-2.275) 10(2.425,-1.625) 11(2.425,-0.975) 12(2.425,-0.325) 13(2.425,0.325) 14(2.425,0.975) 15(2.425,1.625) 16(2.425,2.275)
  silkscreen extent -3.5,-2.6 1.6,2.6
D_SMA#1 [mm] "SMA Molded Diode, 2-Leads, Body 4.3x2.7mm, SOD-128"
  rect 2.2x1.6 smd mask-2539.97: 1(-2.2,0)
  rrect50% 2.2x1.6 smd mask-2539.97: 2(2.2,0)
  silkscreen extent -2.4,-1.5 2.9,1.5, body extent -2.75,-1.4 2.75,1.4, height 2.6
D_SMA#2 [mm] "SMA Molded Diode, 2-Leads, Body 4.3x2.7mm, SOD-128"
  rect 2.2x1.6 smd mask+0.102: 1(-2.2,0)
  rrect50% 2.2x1.6 smd mask+0.102: 2(2.2,0)
  silkscreen extent -2.4,-1.5 2.9,1.5, body extent -2.75,-1.4 2.75,1.4, height 2.6
D_SMB#1 [mm] "SMB Molded Diode, 2-Leads, Body 4.3x3.5mm"
  rect 2.2x2.2 smd mask+0.102: 1(-2.1,0)
  rrect50% 2.2x2.2 smd mask+0.102: 2(2.1,0)
  Top Layer pour cut-out: -1.524,2.1 -1.524,-2.1 1.524,-2.1 1.524,2.1
  silkscreen extent -2.4,-2.1 3.2,2.1, body extent -2.75,-1.95 2.75,1.95, height 2.45
D_SMB#2 [mm] "SMB Molded Diode, 2-Leads, Body 4.3x3.5mm"
  rect 2.2x2.2 smd mask-2539.97: 1(-2.1,0)
  rrect50% 2.2x2.2 smd mask-2539.97: 2(2.1,0)
  Top Layer pour cut-out: -1.524,2.1 -1.524,-2.1 1.524,-2.1 1.524,2.1
  silkscreen extent -2.4,-2.1 3.2,2.1, body extent -2.75,-1.95 2.75,1.95, height 2.45
FH_24101812 [mm] "FUSE HOLDER for 2410 and 1812 sizes"
  rrect30% 4.5x4 smd: 1(-3,0) 2(2.9,0)
  silkscreen extent -4.9,-2.6 4.9,2.6, body extent -5.1,-2.51 5.1,2.52, height 4.11
FP-ACM2520-2P-MFG [mm]
  rect 0.8x0.4 smd mask-2539.97: 1(-1.15,0.65) 2(-1.15,-0.65) 3(1.15,-0.65) 4(1.15,0.65)
  silkscreen extent -2.22,-1.1 0.38,1.1, body extent -1.65,-1.2 1.65,1.2, height 0.25
FP-DDA0008J-IPC_C [mm]
  rect 1.874x0.542 smd mask+0: 1(-2.316,1.905)
  rrect100% 1.874x0.542 smd mask+0: 2(-2.316,0.635) 3(-2.316,-0.635) 4(-2.316,-1.905) 5(2.316,-1.905) 6(2.316,-0.635) 7(2.316,0.635) 8(2.316,1.905)
  rect 2.3x3.1 smd mask+0: 9(0,0)
  silkscreen extent -3.97,-2.45 0.75,2.45, body extent -3,-2.45 3,2.45, height 1.7
IND_AMPLA7050S-100MT [mm]
  rect 2.95x3.5 smd: 1(-2.725,0) 2(2.725,0)
  silkscreen extent -3.65,-3.3 3.65,3.3, body extent -3.72,-3.3 3.72,3.3, height 4.8
JPH_3#1 [mm] "Jumper Header 2.54mm Pitch, 3PIN, Vertical"
  rect 2x2 hole 1.1 mask-2539.97: 1(-2.54,0) 2(0,0) 3(2.54,0)
  silkscreen extent -3.9,-1.4 3.9,1.4, body extent -3.82,-1.27 3.8,1.27, height 8.57
JPH_3#2 [mm] "Jumper Header 2.54mm Pitch, 3PIN, Vertical"
  oval 1.6x2.2 hole 1: 1(-2.54,0) 3(2.54,0)
  rect 1.6x2.2 hole 1: 2(0,0)
  silkscreen extent -3.9,-1.4 3.9,1.4, body extent -3.82,-1.27 3.8,1.27, height 8.57
LED1206GRN [mm] "LED, 1206, GREEN"
  rect 1x1.6 smd mask-2539.97: 1(-1.4,0)
  rrect50% 1x1.6 smd mask-2539.97: 2(1.4,0)
  Top Layer pour cut-out: -1.1,1.1 -1.1,-1.1 1.1,-1.1 1.1,1.1
  silkscreen extent -2.1,-1 2.3,1, body extent -1.6,-0.8 1.6,0.8, height 0.68
LED1206RED [mm] "LED, 1206, RED"
  rect 1x1.6 smd mask-2539.97: 1(-1.4,0)
  rrect50% 1x1.6 smd mask-2539.97: 2(1.4,0)
  Top Layer pour cut-out: -1.1,1.1 -1.1,-1.1 1.1,-1.1 1.1,1.1
  silkscreen extent -2.1,-1 2.3,1, body extent -1.6,-0.8 1.6,0.8, height 0.68
PCBComponent_1#1 [mm]
  rect 1.5x1.5 hole 1: 0(-2.1,-7.59) 1(-2.1,-5.05) 2(-2.1,2.57) 3(-2.1,5.11) 4(-2.1,7.65)
  silkscreen extent -3,-9.82 3,9.82
PCBComponent_1#2 [mm]
  silkscreen extent -5.35,-4.64 5.33,4.64
PRKT-SOT23-3_V [mm] "SOT23, 3-Leads, Body 2.92x1.3mm, Pitch 0.94mm"
  rect 0.84x0.84 smd mask-2539.97: 1(-1,0.94) 3(1,0)
  rect 0.84x0.9 smd mask-2539.97: 2(-1,-0.94)
  silkscreen extent -2.09,-1.46 0.65,1.46, body extent -0.65,-1.46 0.65,1.46, height 1.17
R0805 [mm] "CHIP RESISTOR 1/8 WATT ,2.0X1.3mm, 0805, 2012"
  rrect50% 1x1.2 smd mask-2539.97: 1(-1,0) 2(1,0)
  Top Layer pour cut-out: -0.5,0.8 0.5,0.8 0.5,-0.8 -0.5,-0.8
  silkscreen extent -1.7,-0.8 1.7,0.8, body extent -1.15,-0.67 1.15,0.68, height 0.76
R1206#1 [mm] "CHIP RESISTOR 1/4 WATT, Body 3.2x1.6mm,1206, 3216"
  rrect50% 1.6x1.6 smd mask-2539.97: 1(-1.4,0) 2(1.4,0)
  Top Layer pour cut-out: -0.8,1 -0.8,-1 0.8,-1 0.8,1
  silkscreen extent -2.4,-1 2.4,1, body extent -1.67,-0.86 1.68,0.87, height 0.85
R1206#2 [mm] "CHIP RESISTOR 1/4 WATT, Body 3.2x1.6mm,1206, 3216"
  rrect50% 1.6x1.6 smd mask+0.075: 1(-1.4,0) 2(1.4,0)
  Top Layer pour cut-out: -0.8,1 -0.8,-1 0.8,-1 0.8,1
  silkscreen extent -2.4,-1 2.4,1, body extent -1.68,-0.86 1.68,0.86, height 0.85
SOIC127P599X175-8N [mm]
  rrect25% 1.97x0.6 smd mask+0.102: 1(-2.47,1.905) 2(-2.47,0.635) 3(-2.47,-0.635) 4(-2.47,-1.905) 5(2.47,-1.905) 6(2.47,-0.635) 7(2.47,0.635) 8(2.47,1.905)
  silkscreen extent -4.14,-2.52 1.95,2.52, body extent -3,-2.45 3,2.45, height 1.75
SOIC254P1030X460-4N [mm]
  rrect25% 1.41x1.47 smd mask-2539.97: 1(-4.85,1.27) 2(-4.85,-1.27) 3(4.85,-1.27) 4(4.85,1.27)
  silkscreen extent -6.35,-2.44 3.4,2.44, body extent -3.94,-2.29 3.94,2.29, height 8.1
SOT23_3#1 [mm] "SOT-23, Micro3, MO-178, TO-236AB, MO-193C, SuperSOT3, SC-59, 1.5x3mm, Pitch 1.9mm"
  rrect50% 1.2x0.7 smd mask-2539.97: 1(-1.3,1) 2(-1.3,-1) 3(1.3,0)
  silkscreen extent -0.8,-1.6 0.8,1.6, body extent -1.32,-1.5 1.32,1.5, height 1.08
SOT23_3#2 [mm] "SOT-23, Micro3, MO-178, TO-236AB, MO-193C, SuperSOT3, SC-59, 1.5x3mm, Pitch 1.9mm"
  rrect50% 1.2x0.7 smd mask+0.1: 1(-1.3,1) 2(-1.3,-1) 3(1.3,0)
  silkscreen extent -0.8,-1.6 0.8,1.6, body extent -1.32,-1.5 1.32,1.5, height 1.08
SOT95P230X110-3N [mil]
  rect 46x22 smd mask-99999: 1(-43,37) 2(-43,-37) 3(43,0)
  silkscreen extent -14,-60 28,60, body extent -47,-57 47,57, height 45
SOT95P280X145-5N [mm]
  rrect50% 1.21x0.59 smd mask+0.102: 1(-1.255,0.95) 2(-1.255,0) 3(-1.255,-0.95) 4(1.255,-0.95) 5(1.255,0.95)
  silkscreen extent -2.51,-1.45 0.8,1.45, body extent -1.4,-1.45 1.4,1.45, height 1.45
STM-LQFP100_N [mm] "Thin QFP, 100-Leads, Body 14x14mm, Pitch 0.5mm, IPC Medium Density"
  oval 1.8x0.3 smd mask+0.102: 1(-7.55,6) 2(-7.55,5.5) 3(-7.55,5) 4(-7.55,4.5) 5(-7.55,4) 6(-7.55,3.5) 7(-7.55,3) 8(-7.55,2.5) 9(-7.55,2) 10(-7.55,1.5) 11(-7.55,1) 12(-7.55,0.5) 13(-7.55,0) 14(-7.55,-0.5) 15(-7.55,-1) 16(-7.55,-1.5) 17(-7.55,-2) 18(-7.55,-2.5) 19(-7.55,-3) 20(-7.55,-3.5) 21(-7.55,-4) 22(-7.55,-4.5) 23(-7.55,-5) 24(-7.55,-5.5) 25(-7.55,-6) 51(7.55,-6) 52(7.55,-5.5) 53(7.55,-5) 54(7.55,-4.5) 55(7.55,-4) 56(7.55,-3.5) 57(7.55,-3) 58(7.55,-2.5) 59(7.55,-2) 60(7.55,-1.5) 61(7.55,-1) 62(7.55,-0.5) 63(7.55,0) 64(7.55,0.5) 65(7.55,1) 66(7.55,1.5) 67(7.55,2) 68(7.55,2.5) 69(7.55,3) 70(7.55,3.5) 71(7.55,4) 72(7.55,4.5) 73(7.55,5) 74(7.55,5.5) 75(7.55,6)
  oval 0.3x1.8 smd mask+0.102: 26(-6,-7.55) 27(-5.5,-7.55) 28(-5,-7.55) 29(-4.5,-7.55) 30(-4,-7.55) 31(-3.5,-7.55) 32(-3,-7.55) 33(-2.5,-7.55) 34(-2,-7.55) 35(-1.5,-7.55) 36(-1,-7.55) 37(-0.5,-7.55) 38(0,-7.55) 39(0.5,-7.55) 40(1,-7.55) 41(1.5,-7.55) 42(2,-7.55) 43(2.5,-7.55) 44(3,-7.55) 45(3.5,-7.55) 46(4,-7.55) 47(4.5,-7.55) 48(5,-7.55) 49(5.5,-7.55) 50(6,-7.55) 76(6,7.55) 77(5.5,7.55) 78(5,7.55) 79(4.5,7.55) 80(4,7.55) 81(3.5,7.55) 82(3,7.55) 83(2.5,7.55) 84(2,7.55) 85(1.5,7.55) 86(1,7.55) 87(0.5,7.55) 88(0,7.55) 89(-0.5,7.55) 90(-1,7.55) 91(-1.5,7.55) 92(-2,7.55) 93(-2.5,7.55) 94(-3,7.55) 95(-3.5,7.55) 96(-4,7.55) 97(-4.5,7.55) 98(-5,7.55) 99(-5.5,7.55) 100(-6,7.55)
  silkscreen extent -7.67,-6.25 6.25,6.82, body extent -7,-7 7,7, height 1.6
TSSOP16 [mil]
  rect 12x39 smd mask+4: 1(-89.57,-114.87) 2(-63.98,-114.87) 3(-38.39,-114.87) 4(-12.8,-114.87) 5(12.8,-114.87) 6(38.39,-114.87) 7(63.98,-114.87) 8(89.57,-114.87) 9(89.57,114.87) 10(63.98,114.87) 11(38.39,114.87) 12(12.8,114.87) 13(-12.8,114.87) 14(-38.39,114.87) 15(-63.98,114.87) 16(-89.57,114.87)
  silkscreen extent -122,-94 106,94, body extent -98,-126 98,126, height 47
USBC_SMD_16_DX07S016JA1 [mm] "CONN, USB, Type C, DX07S016JA1, popular*"
  rrect50% 0.5x1 smd mask-2539.97: A1B12(3.1,0) A4B9(2.35,0) B1A12(-3.1,0) B4A9(-2.35,0)
  rrect50% 0.3x1 smd mask-2539.97: A5(1.25,0) A6(0.25,0) A7(-0.25,0) A8(-1.25,0) B5(-1.75,0) B6(-0.75,0) B7(0.75,0) B8(1.75,0)
  oval 1x2.4 hole 0.6 slot 1.8 at 90 deg: SH1(-4.3,4.3) SH2(4.3,4.3)
  oval 1x2 hole 0.6 slot 1.6 at 90 deg: SH3(-4.3,0.4) SH4(4.3,0.4)
  round 0.7 hole 0.7 unplated: ""(-2.99,1.12) ""(2.99,1.12)
  silkscreen extent -4.5,1.6 4.5,6.72, body extent -4.47,-0.2 4.47,6.7, height 3.18
VREG_TLV76133DCYR [mm]
  rect 2.15x0.95 smd mask-2539.97: 1(-2.9,2.3) 2(-2.9,0) 3(-2.9,-2.3)
  rect 2.15x3.25 smd mask-2539.97: 4(2.9,0)
  silkscreen extent -4.7,-3.25 1.75,3.25, body extent -3.5,-3.25 3.5,3.25, height 1.8
XH_4 [mm] "PW10-x-M, JST-BxB-XH-A pitch: 2.5mm, 3A/250v"
  rect 2x2 hole 1.1 mask-2539.97: 1(-3.75,0) 2(-1.25,0) 3(1.25,0) 4(3.75,0)
  silkscreen extent -6.4,-2.4 6.4,3.5, body extent -6.25,-2.3 6.25,3.4, height 7
XTL_2_11X5 [mm] "SMD crystal resonator, ABL, ABLS, HC-49, HC49 11X4.5MM"
  oval 3x1.5 smd mask+0.102: 1(-5.6,0) 2(5.6,0)
  silkscreen extent -5.7,-2.4 5.7,2.4, body extent -6.4,-2.41 6.4,2.41, height 4.3